# Altium PCB Vehicle_Interface_Tester.PcbDoc (part 1 of 2)
Units mm, origin at the board's own origin, x right, y up, seen from the top; angles counter-clockwise.
Board outline 170 x 109 mm, 8 copper layers (Top Layer, InnerLayer 1 (GND), InnerLayer 2 (Signal), InnerLayer 3 (GND), InnerLayer 4 (Power), InnerLayer 5 (GND), InnerLayer 6 (Signal), Bottom Layer), stack 1.445 mm thick; 100 components, 59 nets, 436 pads, 116 vias.
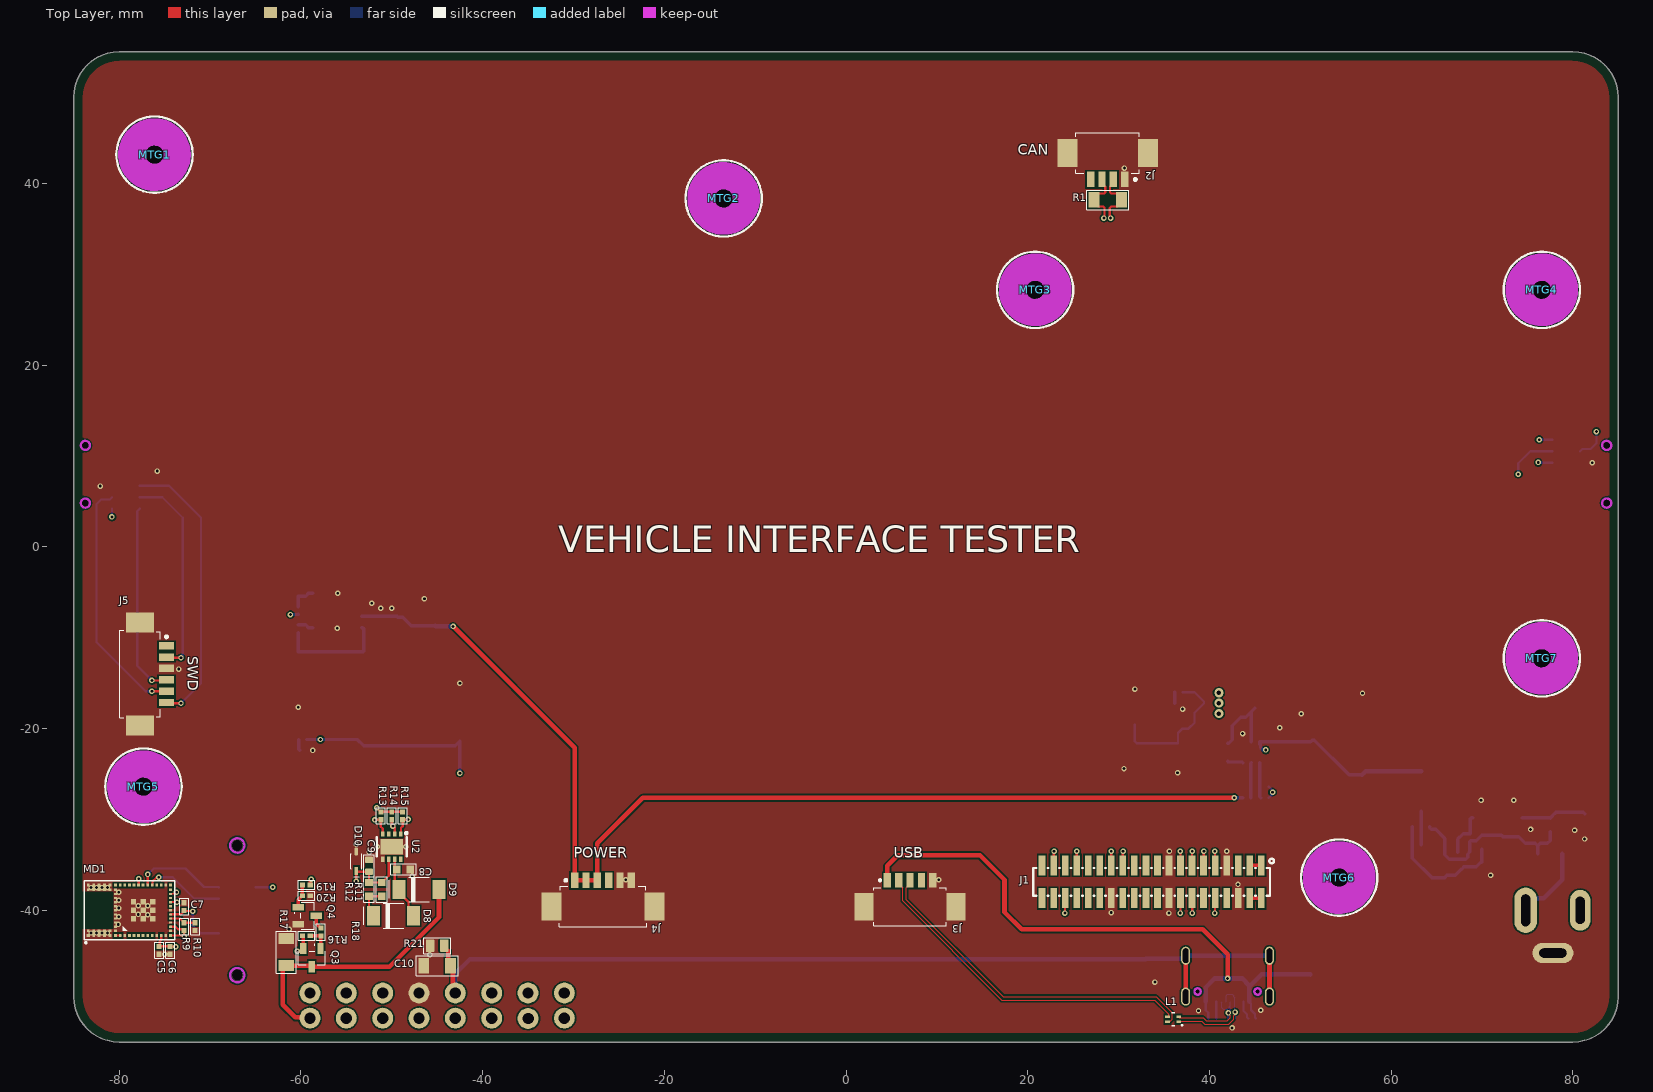
[diagram p0: Top Layer view]
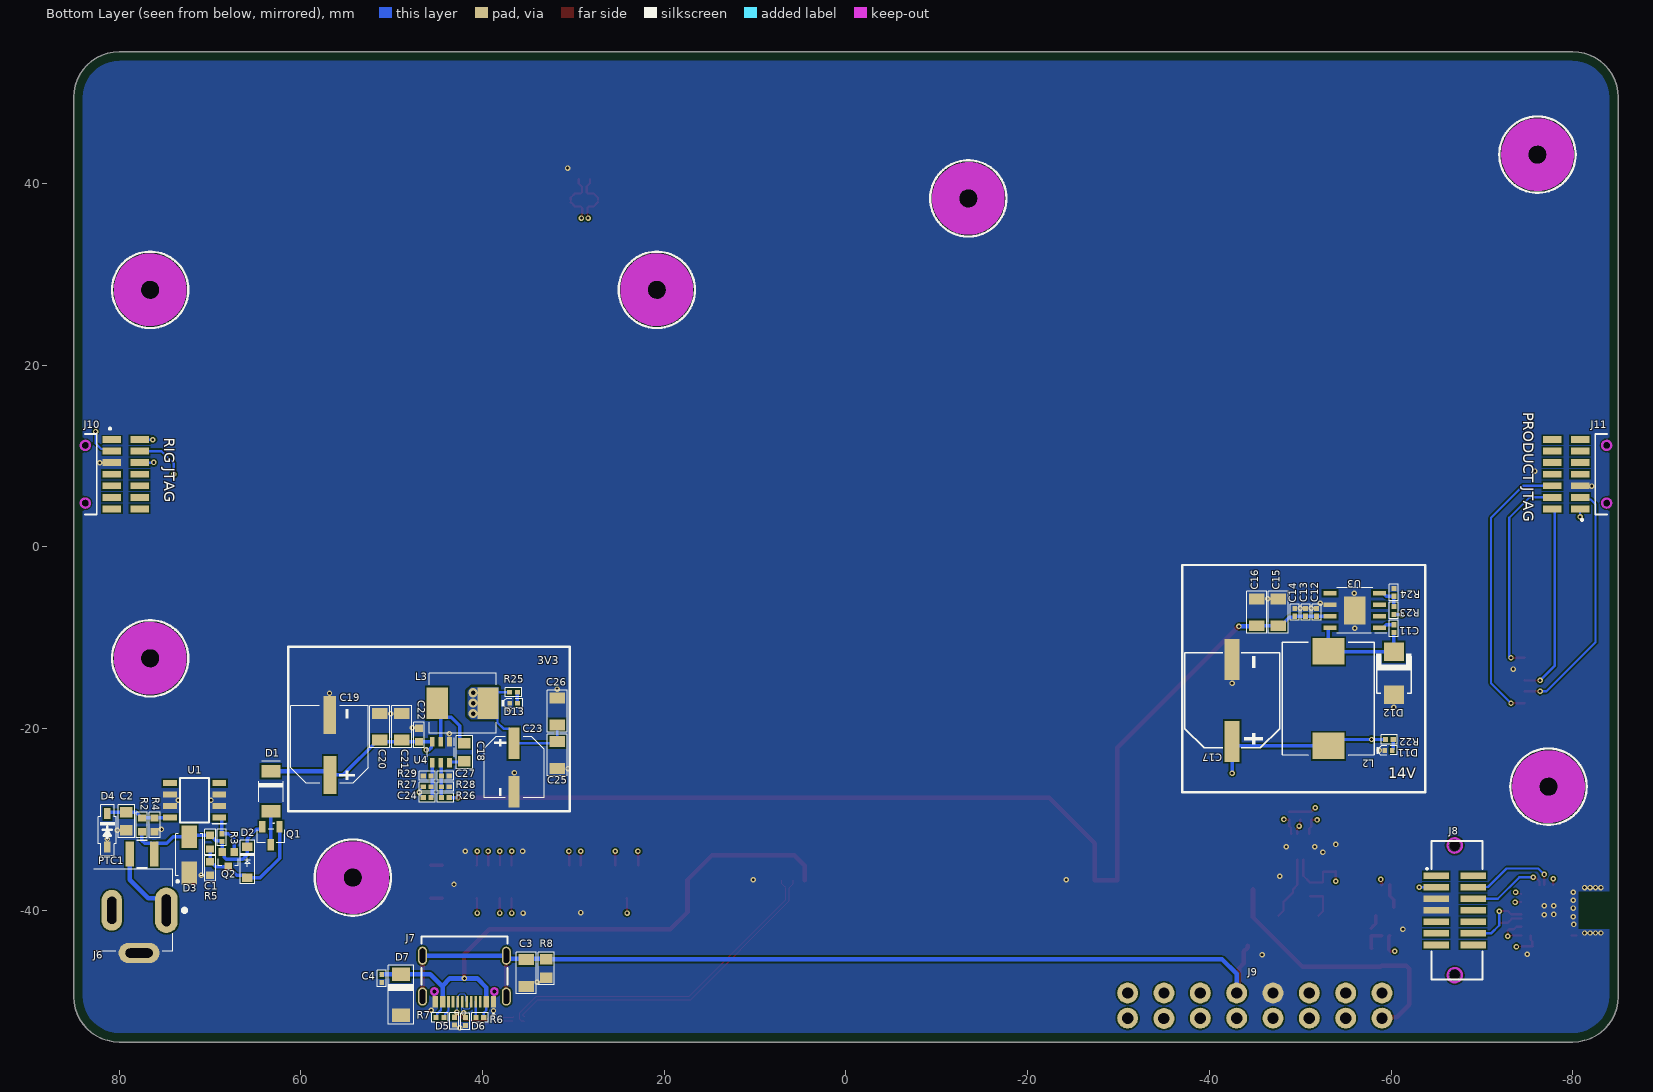
[diagram p1: Bottom Layer view, seen from below]
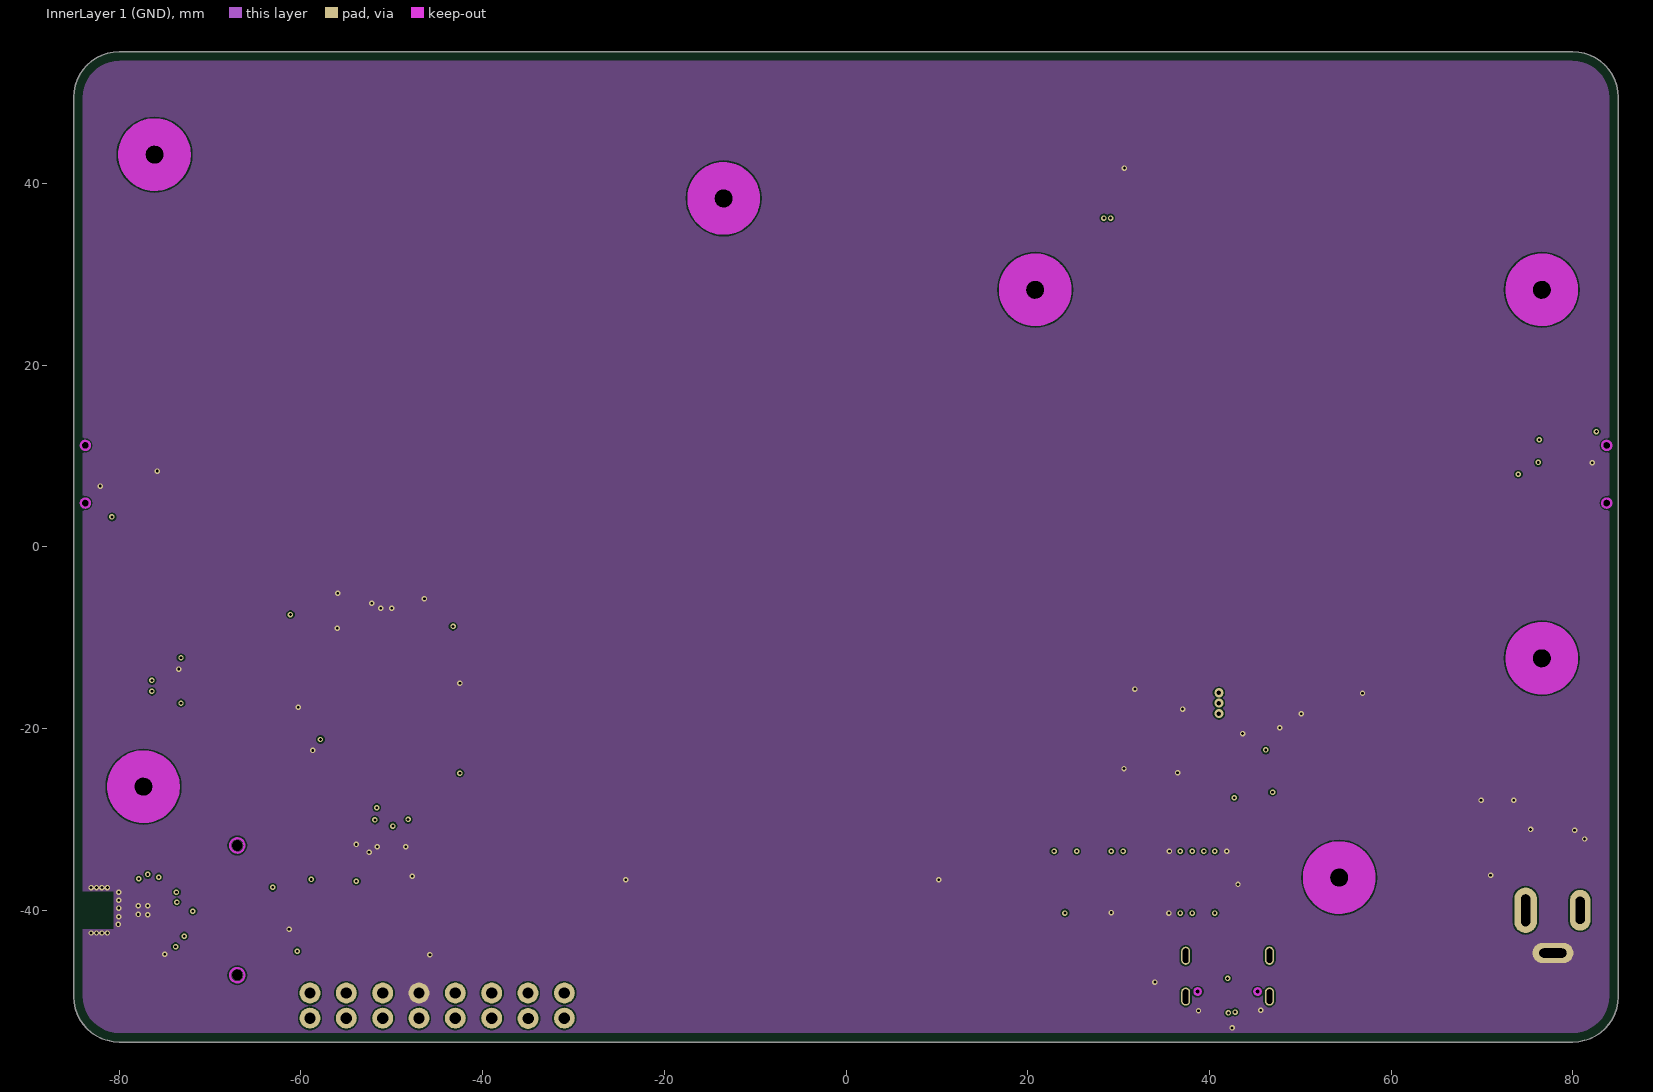
[diagram p2: InnerLayer 1 (GND)]
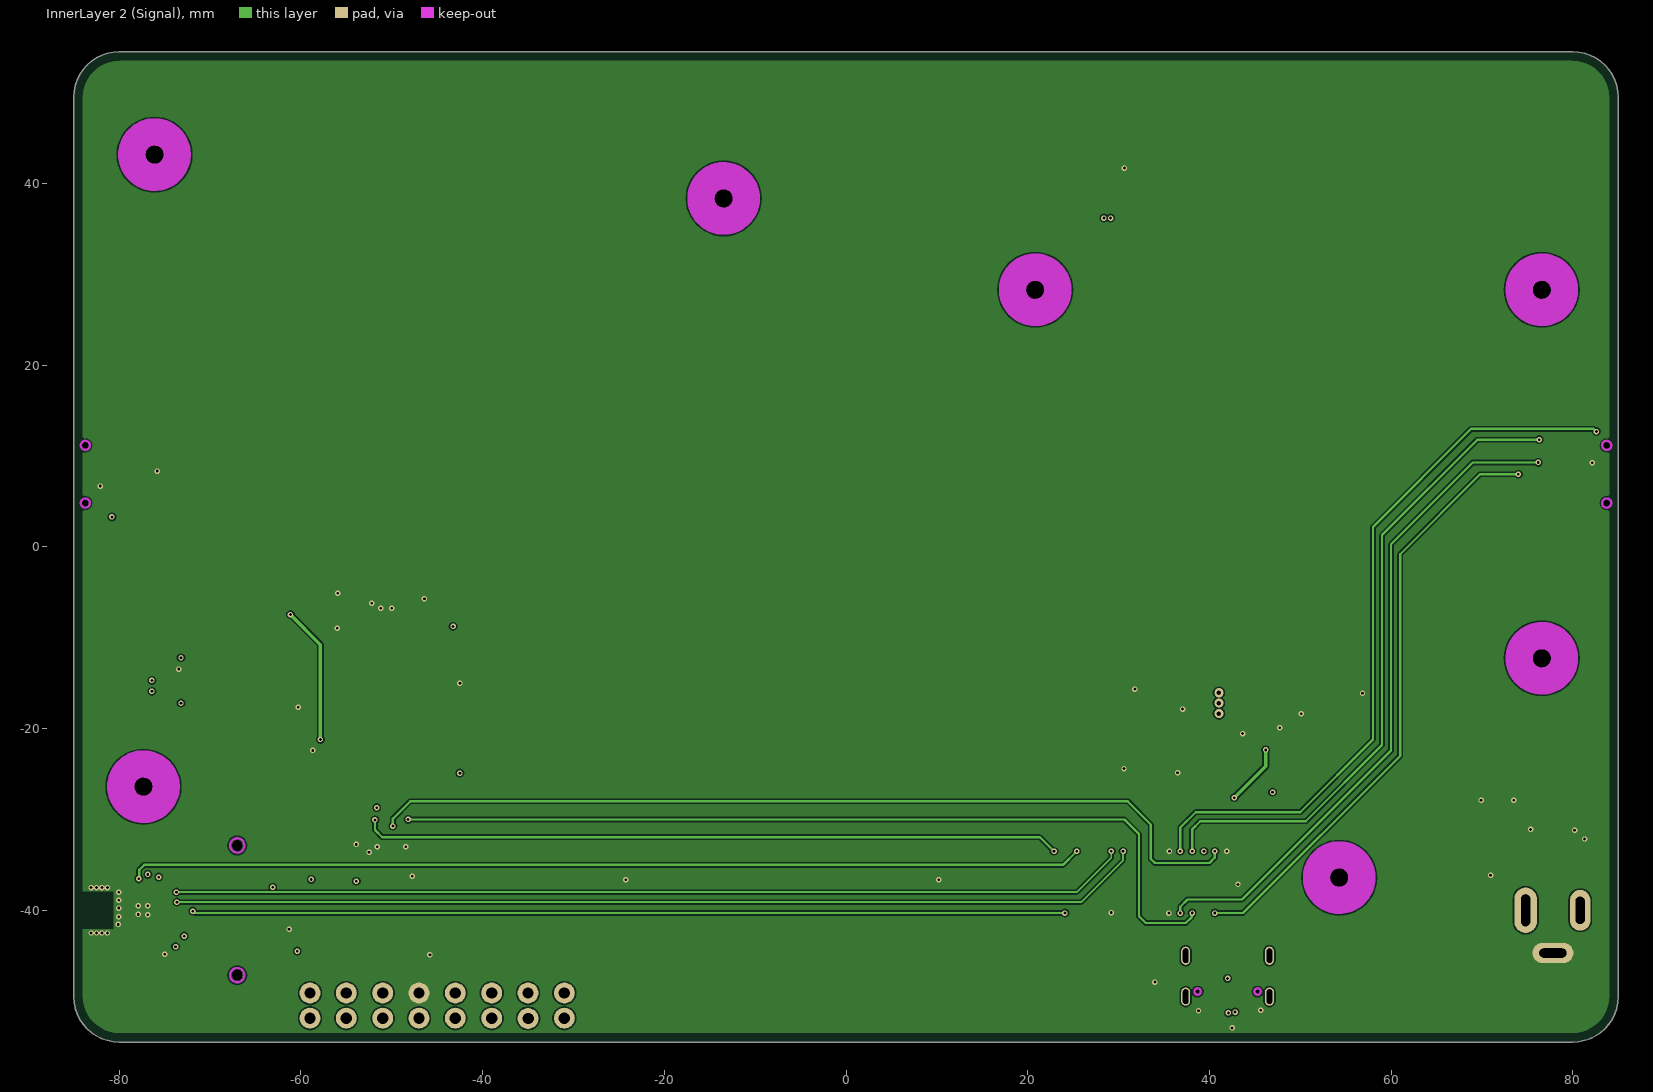
[diagram p3: InnerLayer 2 (Signal)]
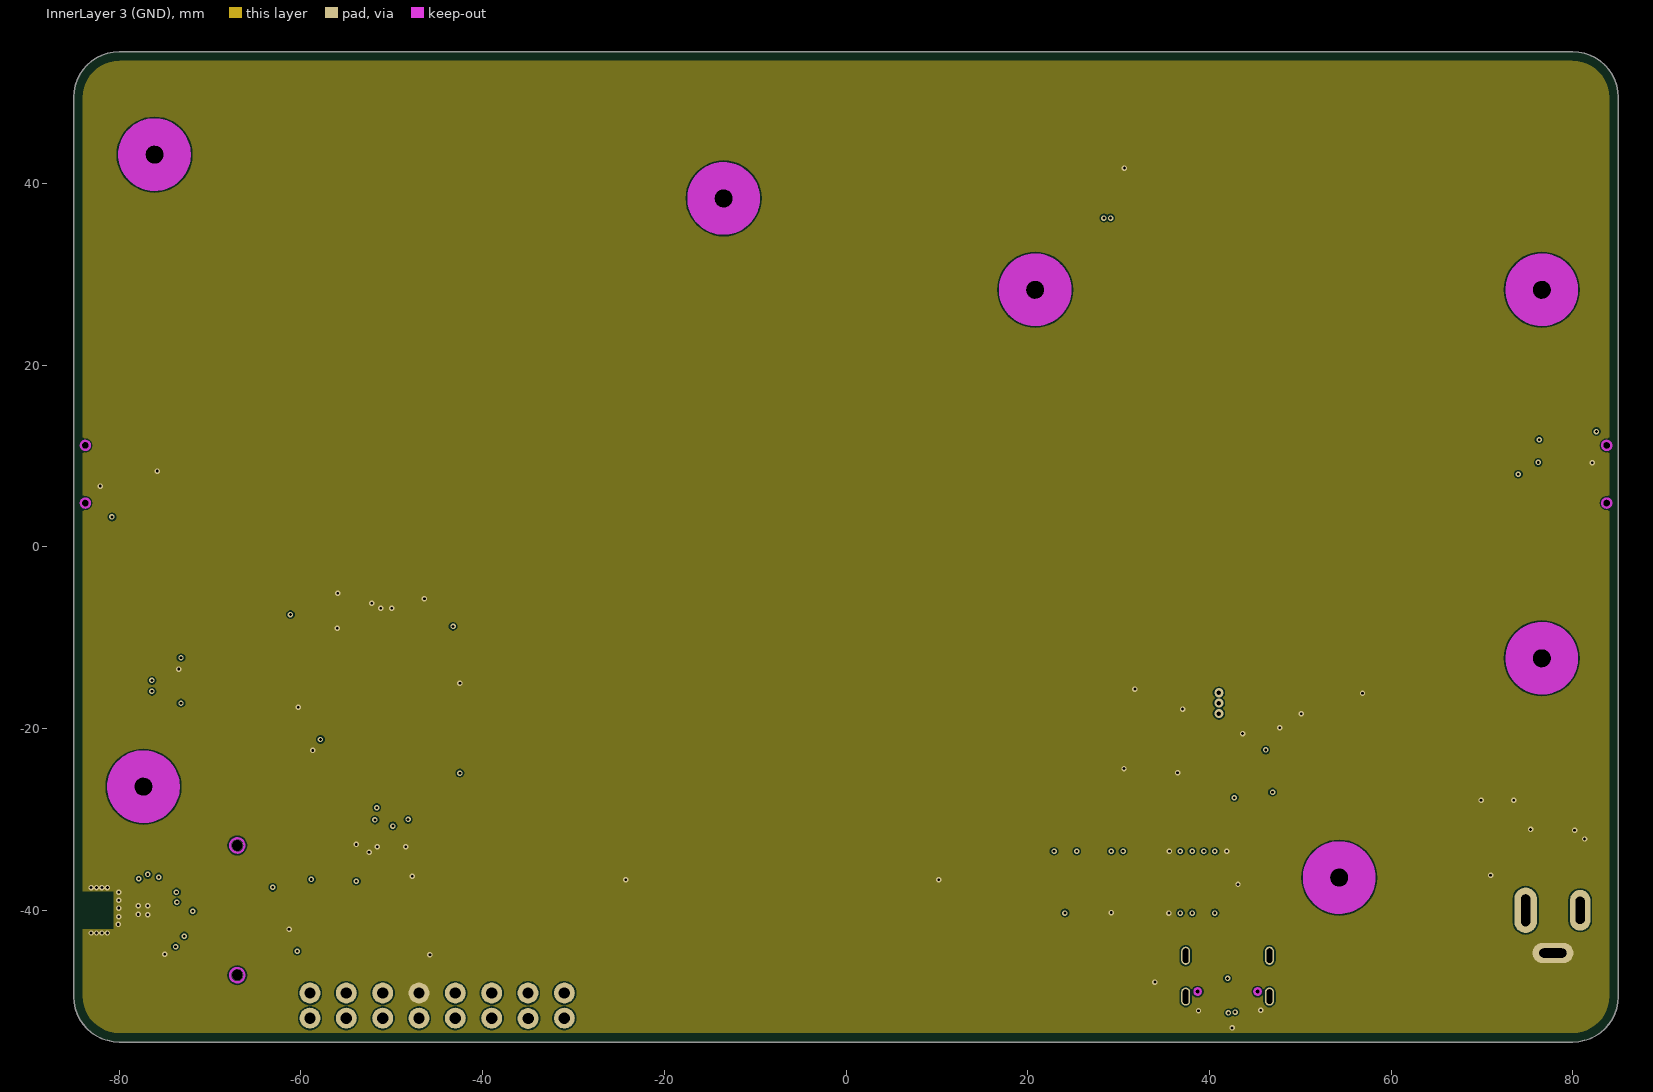
[diagram p4: InnerLayer 3 (GND)]
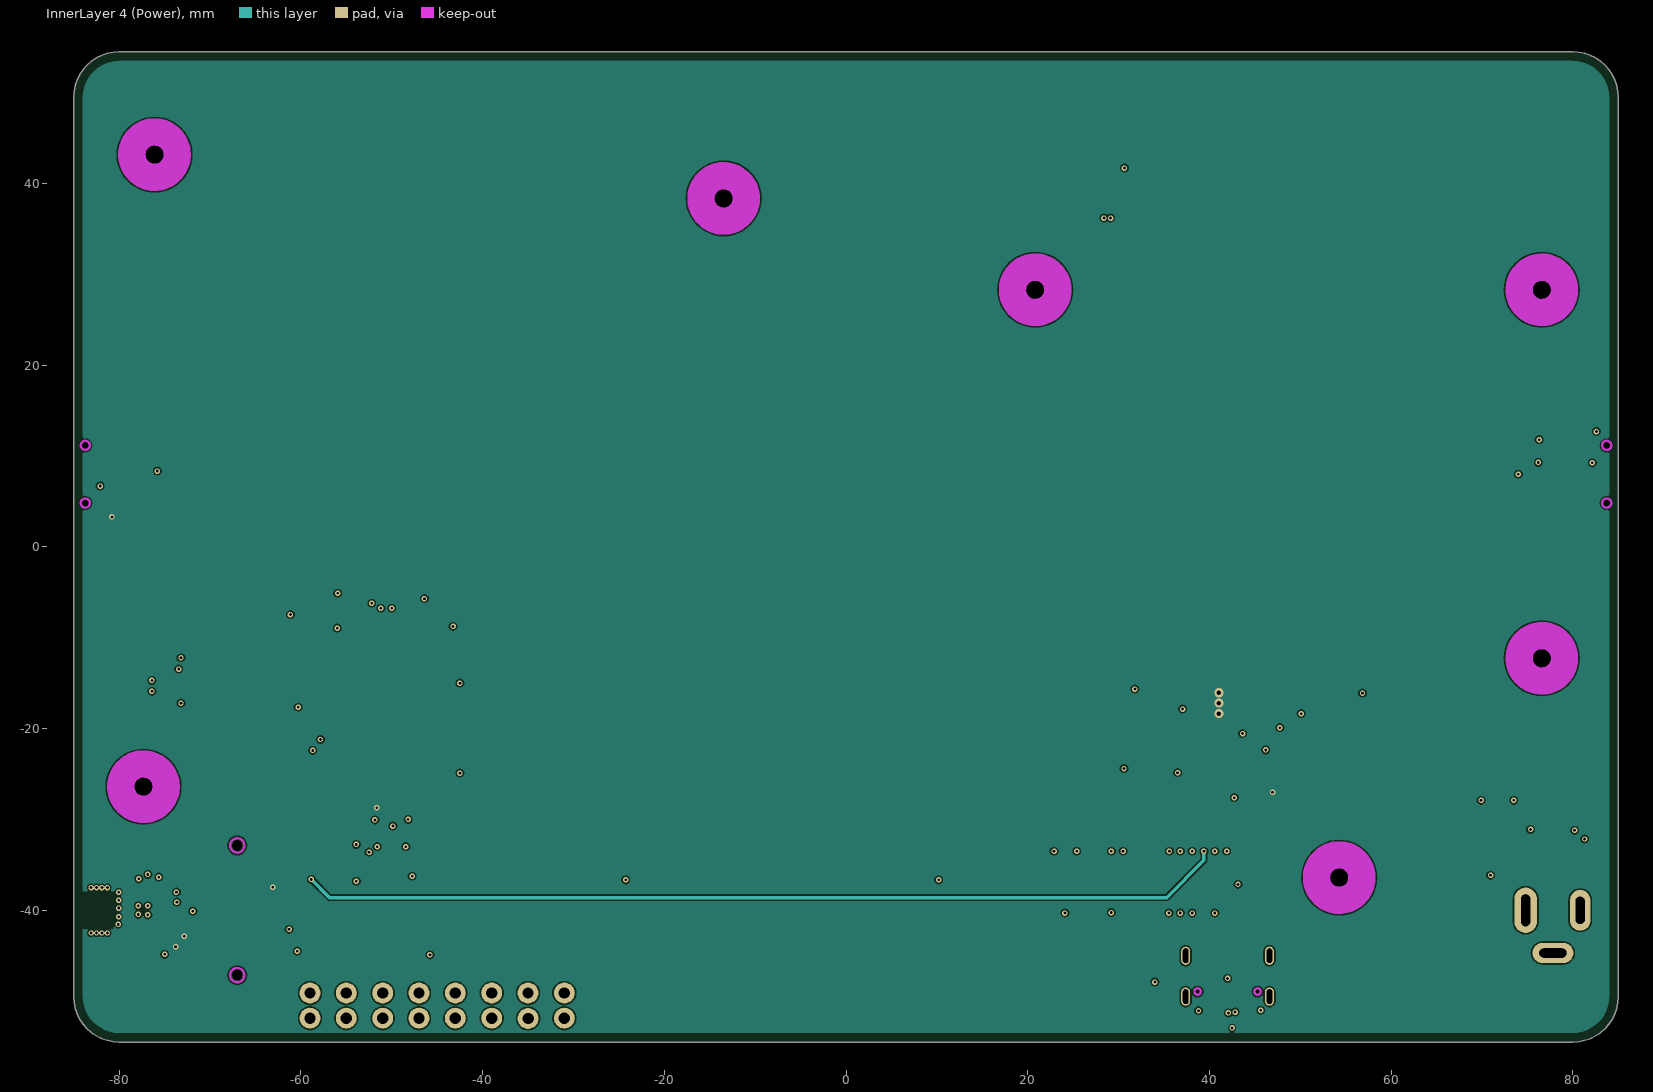
[diagram p5: InnerLayer 4 (Power)]
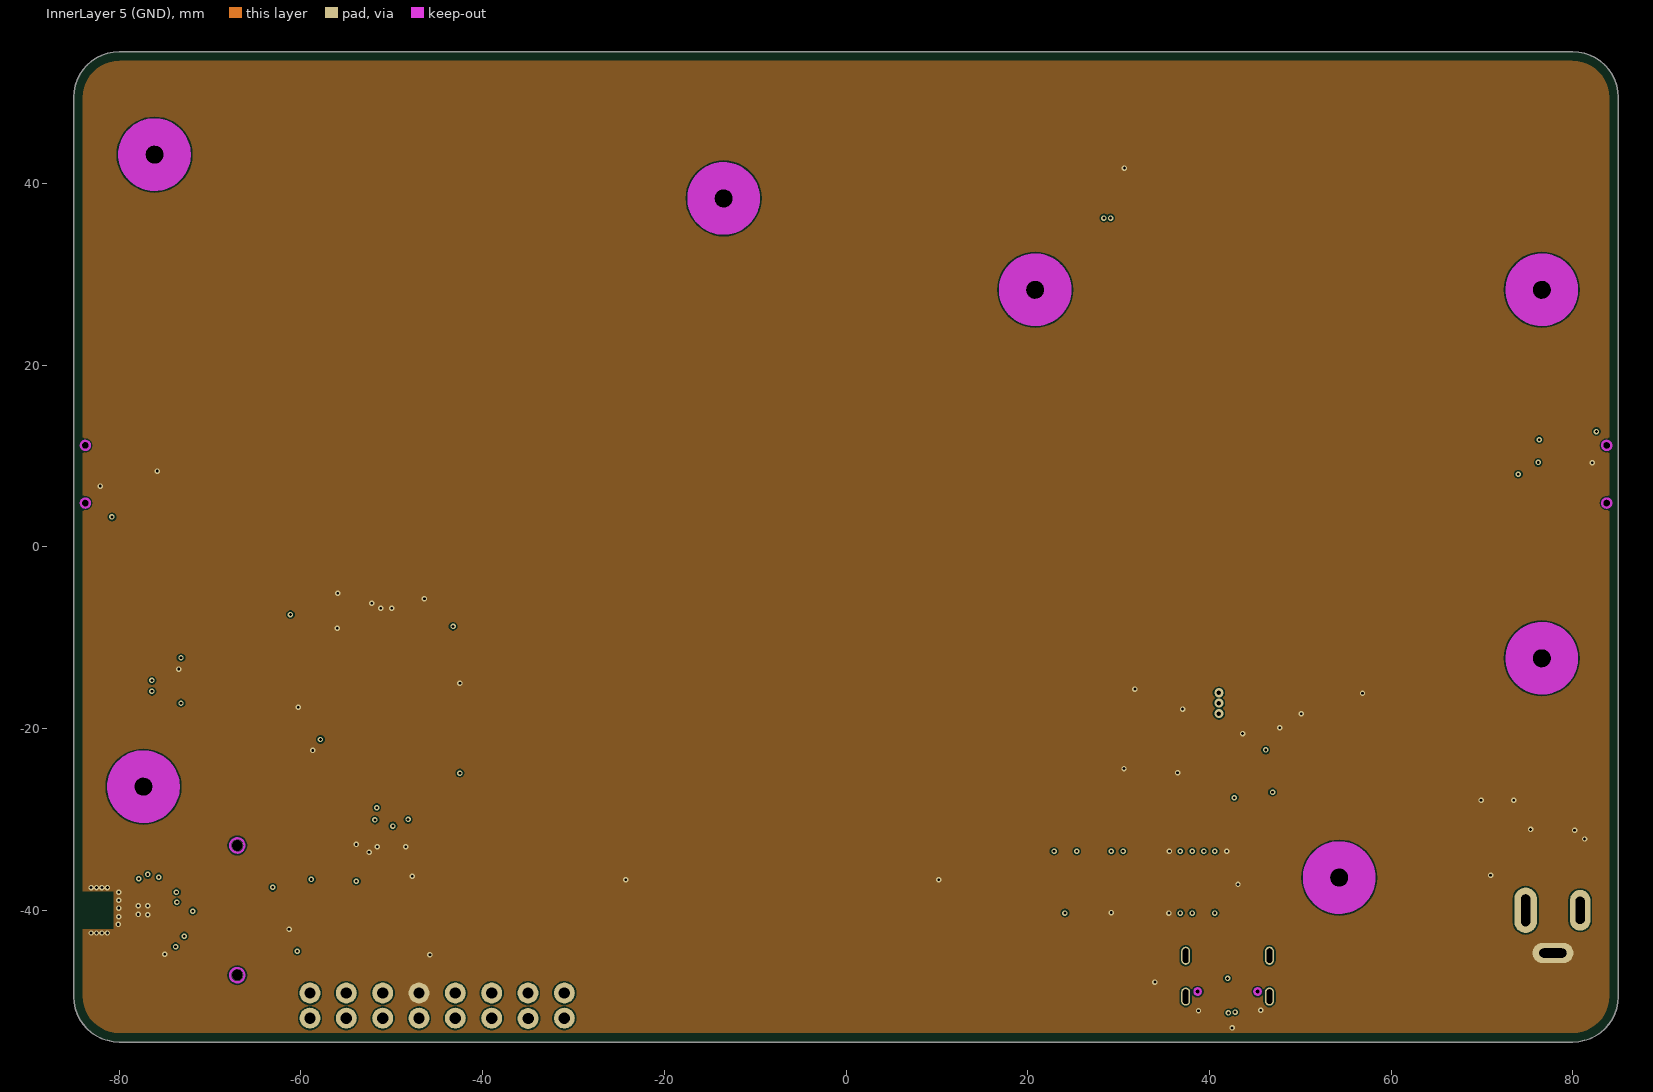
[diagram p6: InnerLayer 5 (GND)]
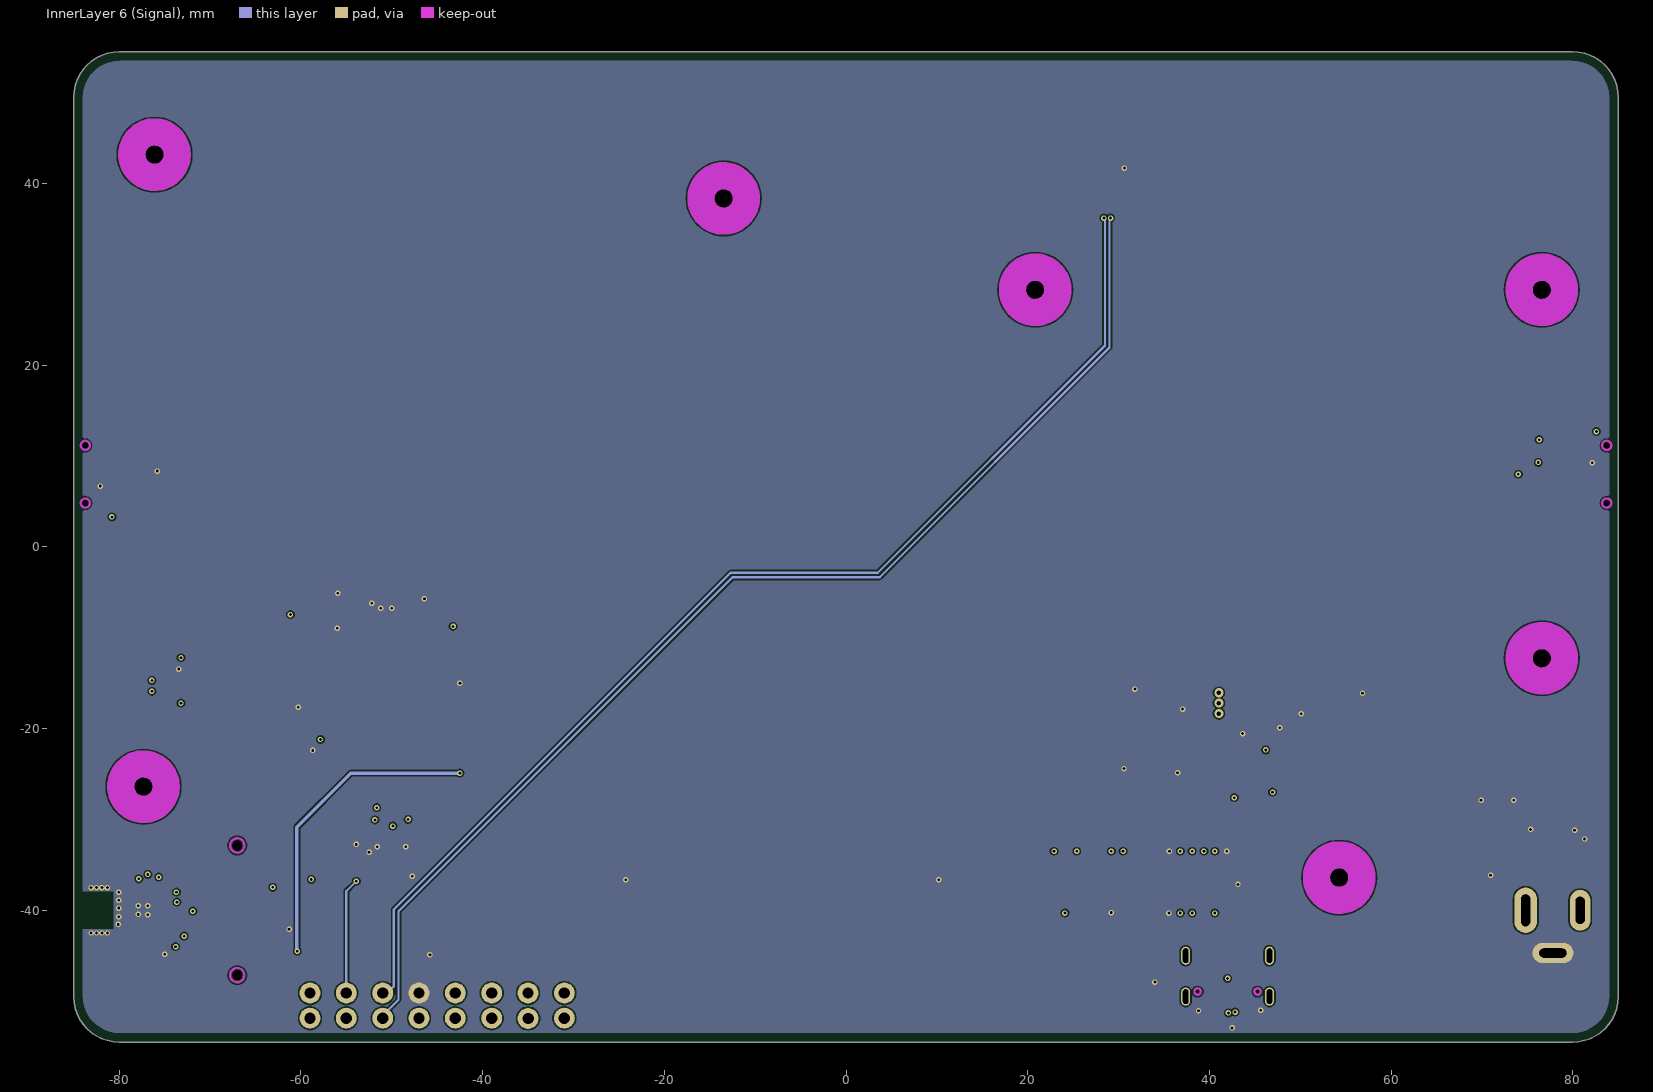
[diagram p7: InnerLayer 6 (Signal)]
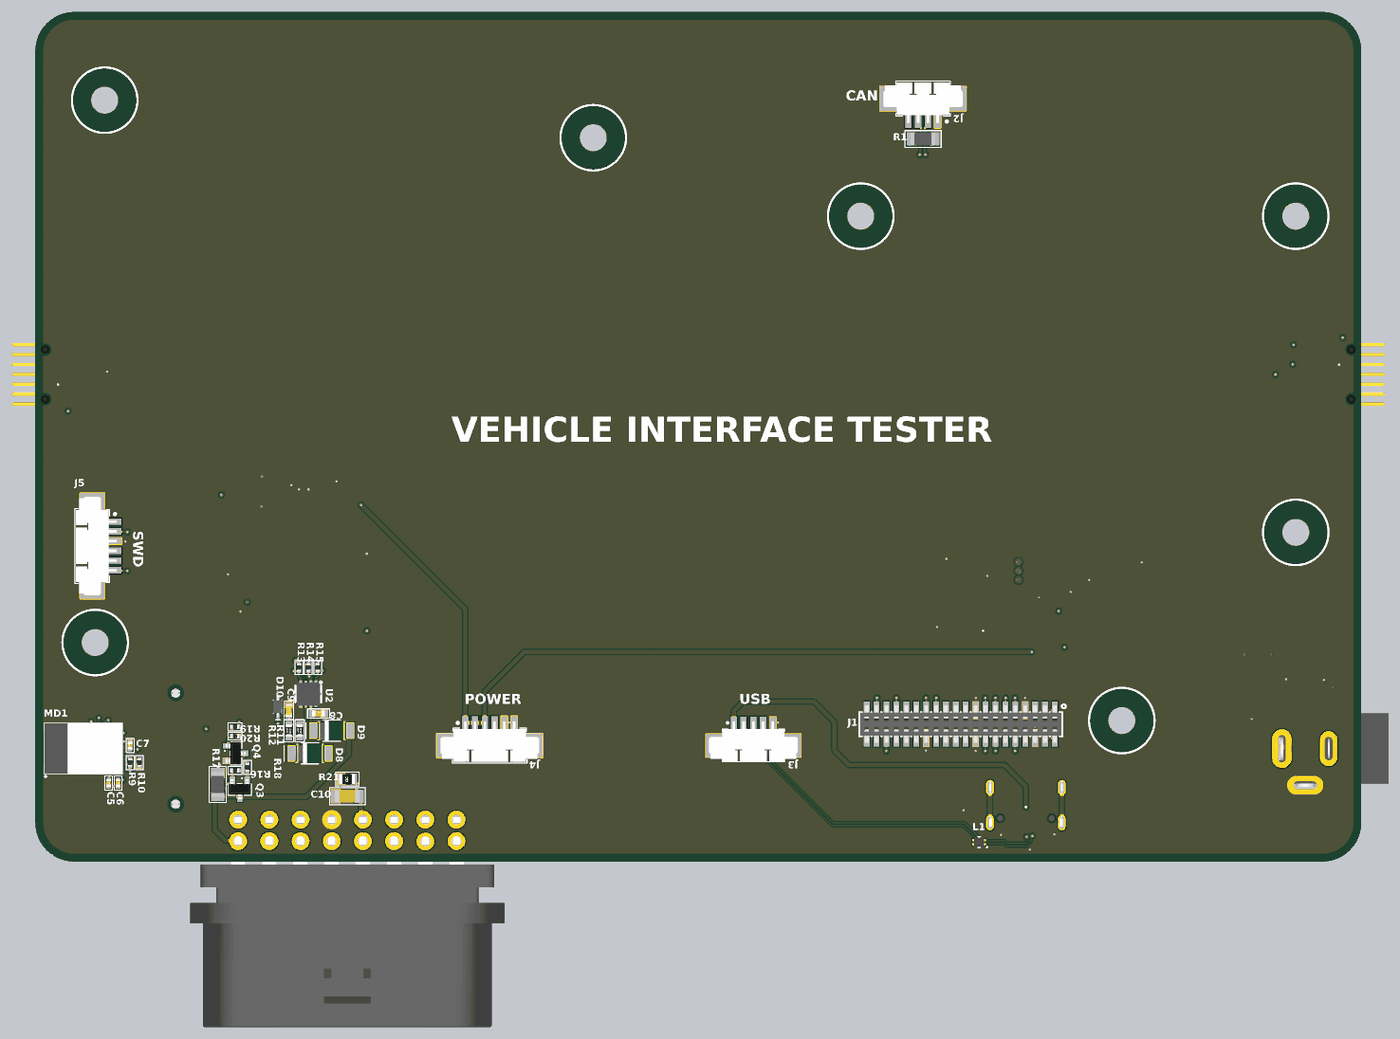
[diagram p9: 3D render of the assembled board from above, using the file's embedded part models]
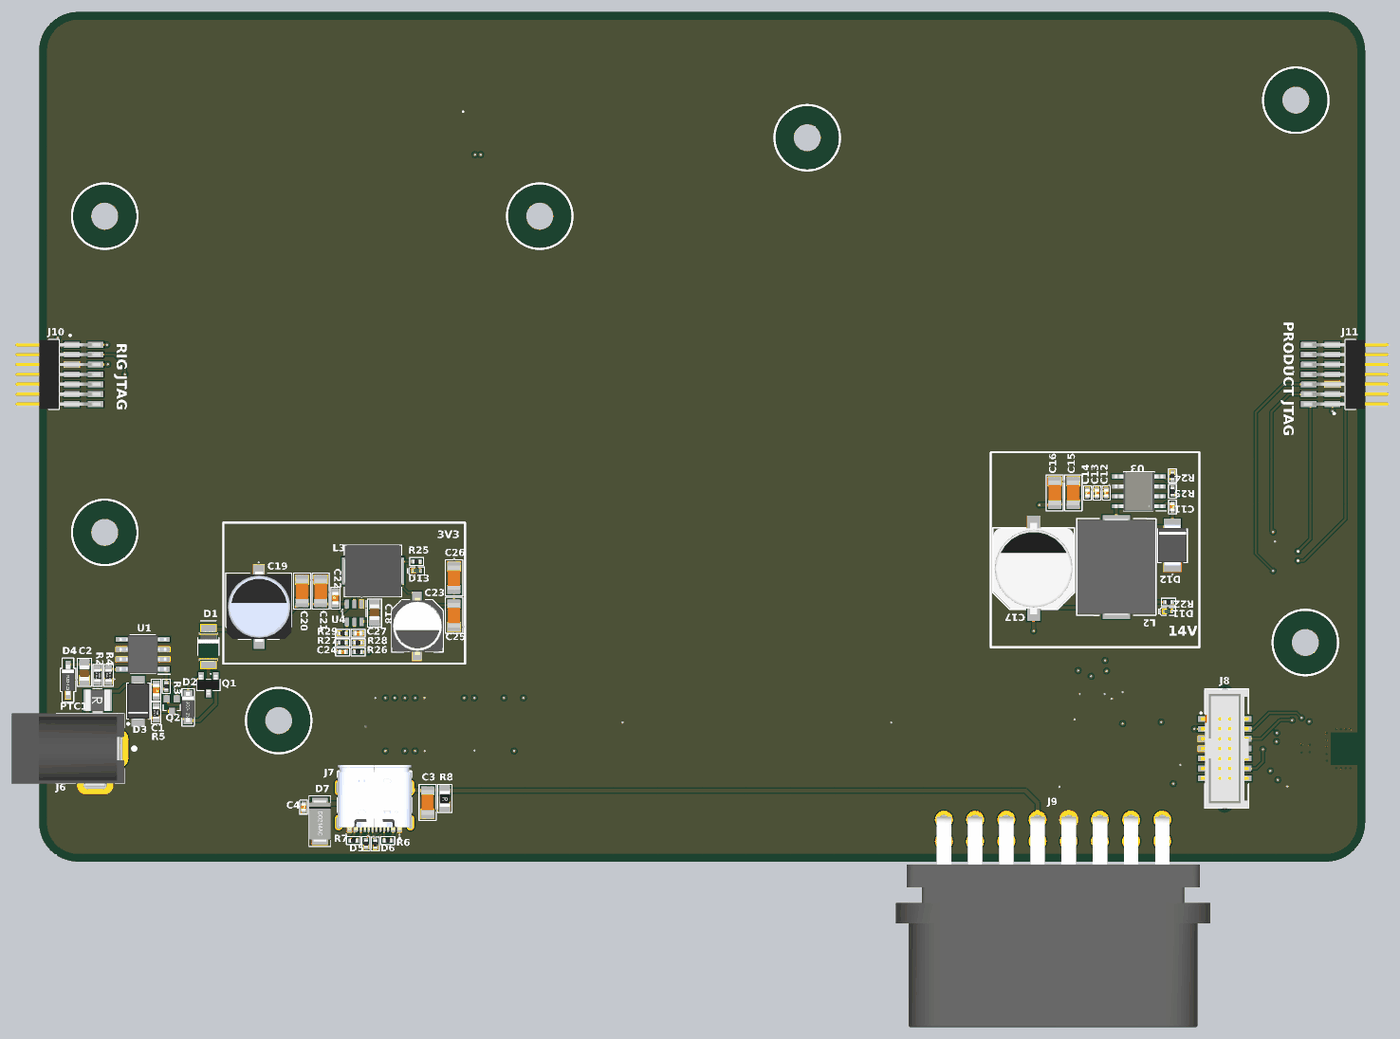
[diagram p10: 3D render of the assembled board from below, using the file's embedded part models]

## Layer stack, top to bottom
Top Solder: solder mask 0.0102, Solder Resist, Dk 3.5
Top Layer: signal copper 0.035
Dielectric 1: prepreg 0.092, PP-013, Dk 4.3
InnerLayer 1 (GND): signal copper 0.0152
Dielectric 2: core 0.25, Core-028, Dk 4.3
InnerLayer 2 (Signal): signal copper 0.0152
Dielectric 3: prepreg 0.1, PP-013, Dk 4.3
InnerLayer 3 (GND): signal copper 0.0152
Dielectric 4: core 0.4, Core-034, Dk 4.6
InnerLayer 4 (Power): signal copper 0.0152
Dielectric 5: prepreg 0.1, PP-013, Dk 4.3
InnerLayer 5 (GND): signal copper 0.0152
Dielectric 6: core 0.25, Core-028, Dk 4.3
InnerLayer 6 (Signal): signal copper 0.0152
Dielectric 7: prepreg 0.092, PP-013, Dk 4.3
Bottom Layer: signal copper 0.035
Bottom Solder: solder mask 0.0102, Solder Resist, Dk 3.5

## Board outline
85,49.5 84.957,50.153 84.83,50.794 84.619,51.413 84.33,52 83.967,52.544 83.536,53.036 83.044,53.467 82.5,53.83 81.913,54.119 81.294,54.33 80.653,54.457 80,54.5 -80,54.5 -80.653,54.457 -81.294,54.33 -81.913,54.119 -82.5,53.83 -83.044,53.467 -83.536,53.036 -83.967,52.544 -84.33,52 -84.619,51.413 -84.83,50.794 -84.957,50.153 -85,49.5 -85,-49.5 -84.957,-50.153 -84.83,-50.794 -84.619,-51.413 -84.33,-52 -83.967,-52.544 -83.536,-53.036 -83.044,-53.467 -82.5,-53.83 -81.913,-54.119 -81.294,-54.33 -80.653,-54.457 -80,-54.5 80,-54.5 80.653,-54.457 81.294,-54.33 81.913,-54.119 82.5,-53.83 83.044,-53.467 83.536,-53.036 83.967,-52.544 84.33,-52 84.619,-51.413 84.83,-50.794 84.957,-50.153 85,-49.5

## Design rules (kind name [scope] priority, off if disabled: settings)
BoardOutlineClearance [All] p1: gap=1 ignorepadtopadclearanceinfootprint=FALSE except(0.5: SMDPad-OutlineEdge SMDPad-CavityEdge SMDPad-CutoutEdge SMDPad-SplitBarrior SMDPad-SplitContinuation)
Clearance Clearance_Chassis [InNet('CHASSIS')] p1: gap=1.5 ignorepadtopadclearanceinfootprint=TRUE except(1: Arc-SMDPad Track-SMDPad SMDPad-SMDPad)
Clearance "Fuse to Holder" [(HasFootprint('Single Pin Receptacle')) vs (HasFootprint('Fuse NO BOM'))] p2: gap=0.127 ignorepadtopadclearanceinfootprint=FALSE except(0: Arc-Hole Track-Hole SMDPad-Hole THPad-Hole Via-Hole Fill-Hole Poly-Hole Region-Hole Text-Hole)
Clearance "Clearance_Poly to Hole_1" [Hole vs InPolygon] p3 off: gap=0.2 ignorepadtopadclearanceinfootprint=FALSE
Clearance Clearance_RS232_PadHole [Hole vs (HasFootprint('9POS D-Sub male Hearting 09551296822741'))] p4 off: gap=0 ignorepadtopadclearanceinfootprint=FALSE
Clearance "Clearance_Poly to Poly" [InPolygon vs InPolygon] p5: gap=0.254 ignorepadtopadclearanceinfootprint=FALSE
Clearance "Clearance_Poly to BGA" [InPolygon vs (InComponent('U1') OR InComponent('U3'))] p6 off: gap=0.178 ignorepadtopadclearanceinfootprint=FALSE except(0: Arc-Hole Track-Hole SMDPad-Hole THPad-Hole Via-Hole Fill-Hole Poly-Hole Region-Hole Text-Hole)
Clearance "Clearance_Poly to All" [InPolygon] p7: gap=0.165 ignorepadtopadclearanceinfootprint=FALSE except(0: Arc-Hole Track-Hole SMDPad-Hole THPad-Hole Via-Hole Fill-Hole Poly-Hole Region-Hole Text-Hole)
Clearance [All] p8: gap=0.127 ignorepadtopadclearanceinfootprint=FALSE except(0: Arc-Hole Track-Hole SMDPad-Hole THPad-Hole Via-Hole Fill-Hole Poly-Hole Region-Hole Text-Hole)
ComponentClearance ComponentClearance_LDC_3D [HasFootprint('Newhaven 7 inch 800x480')] p1: gap=0 collisioncheckmode=3 verticalgap=0 showdistances=FALSE
ComponentClearance ComponentClearance_PCIe [HasFootprint('164 POS PCIe Connector (for NXP Tower Elevator)')] p2: gap=0.254 collisioncheckmode=3 verticalgap=0 showdistances=FALSE
ComponentClearance [All] p3: gap=0.254 collisioncheckmode=3 verticalgap=0.254 showdistances=FALSE
DiffPairsRouting [All] p1: maxlimit=0.254 minlimit=0.254 mostfreqgap=0.254 toplayer_minwidth=0.125 toplayer_maxwidth=0.381 toplayer_prefwidth=0.125 midlayer1_minwidth=0.125 midlayer1_maxwidth=0.381 midlayer1_prefwidth=0.125 midlayer2_minwidth=0.125 midlayer2_maxwidth=0.381 midlayer2_prefwidth=0.125 midlayer3_minwidth=0.125 midlayer3_maxwidth=0.381 midlayer3_prefwidth=0.125 midlayer4_minwidth=0.125 midlayer4_maxwidth=0.381 midlayer4_prefwidth=0.125 midlayer5_minwidth=0.125 midlayer5_maxwidth=0.381 midlayer5_prefwidth=0.125 midlayer6_minwidth=0.125 midlayer6_maxwidth=0.381 midlayer6_prefwidth=0.125 bottomlayer_minwidth=0.125 bottomlayer_maxwidth=0.381 bottomlayer_prefwidth=0.125 maxuncoupledlength=12.7
FanoutControl Fanout_BGA [IsBGA] p1: bgadir=Out bgaviamode=Centered fanoutstyle=BGA fanoutdirection=Alternating viagrid=0.025 // Fanout_BGA (Default Rule)
Height [All] p1 off: minheight=0 maxheight=25.4 prefheight=12.7
HoleSize HoleSize_DIN_Mount [HasFootprint('IG-010 Mount')] p1: absolutevalues=TRUE maxlimit=25.4 minlimit=0.127 maxpercent=80.000 minpercent=20.000
HoleSize HoleSize_Mounting_Holes [HasFootprint('8-32 with washer with contact Mounting Hole')] p2: absolutevalues=TRUE maxlimit=25.4 minlimit=0.127 maxpercent=80.000 minpercent=20.000
HoleSize [All] p3: absolutevalues=TRUE maxlimit=4 minlimit=0.127 maxpercent=80.000 minpercent=20.000
HoleToHoleClearance [All] p1: gap=0.2 allowstackedmicrovias=TRUE
MatchedLengths SRAM_ALL [(InNetClass('SDRAM_Address') OR InNetClass('SDRAM_Control') OR InNetClass('SDRAM_Data'))] p1: tolerance=0.381 checknetsindiffpair=FALSE checkdiffpairvsdiffpair=TRUE checkxsignals=TRUE checkothers=TRUE
MatchedLengths LCD_All [InNetClass('LCD_Control')] p2: tolerance=0.381 checknetsindiffpair=FALSE checkdiffpairvsdiffpair=TRUE checkxsignals=TRUE checkothers=TRUE
MatchedLengths SRAM_DATA [InNetClass('SDRAM_Data')] p3 off: tolerance=0.381 checknetsindiffpair=FALSE checkdiffpairvsdiffpair=TRUE checkxsignals=TRUE checkothers=TRUE
MatchedLengths SRAM_Address [InNetClass('SDRAM_Address')] p4 off: tolerance=0.381 checknetsindiffpair=FALSE checkdiffpairvsdiffpair=TRUE checkxsignals=TRUE checkothers=TRUE
MinimumAnnularRing [All] p1: minimumring=0.102
MinimumSolderMaskSliver [All] p1 off: minsoldermaskwidth=0.102
PlaneClearance [All] p1 off: clearance=0.254
PlaneConnect [All] p1 off: planeconnectstyle=Relief reliefexpansion=0 reliefentries=4 reliefconductorwidth=0.254 reliefairgap=0.127
PolygonConnect "Chassis Plane Connect" [All] p1: connectstyle=Direct reliefconductorwidth=0.254 reliefentries=4 polygonreliefangle="90 Angle" airgapwidth=0.254
PolygonConnect "Soft start connect plane" [HasFootprint('TMLF-4, No Silk')] p2 off: connectstyle=Direct reliefconductorwidth=0.254 reliefentries=4 polygonreliefangle="90 Angle" airgapwidth=0.254
PolygonConnect MOSFET_GND [HasFootprint('DPAK508P1524X483-3N')] p3 off: connectstyle=Direct reliefconductorwidth=0.254 reliefentries=4 polygonreliefangle="90 Angle" airgapwidth=0.254
PolygonConnect Power_connector_GND [HasFootprint('2pos Power, TE Connectivity')] p4 off: connectstyle=Direct reliefconductorwidth=0.254 reliefentries=4 polygonreliefangle="90 Angle" airgapwidth=0.254
PolygonConnect 5V_reg [HasFootprint('D2PAK-STB35NF10T4')] p5 off: connectstyle=Direct reliefconductorwidth=0.254 reliefentries=4 polygonreliefangle="90 Angle" airgapwidth=0.254
PolygonConnect "3V3 Connect" [InNet('3V3_micro')] p6 off: connectstyle=Direct reliefconductorwidth=0.254 reliefentries=4 polygonreliefangle="90 Angle" airgapwidth=0.254
PolygonConnect PolygonConnect_USB_Power [InNet('NetFB1_1')] p7 off: connectstyle=Direct reliefconductorwidth=0.254 reliefentries=4 polygonreliefangle="90 Angle" airgapwidth=0.254
PolygonConnect PolygonConnect_Buck-SW [InNet('Buck-SW')] p8 off: connectstyle=Direct reliefconductorwidth=0.254 reliefentries=4 polygonreliefangle="90 Angle" airgapwidth=0.254
PolygonConnect PolygonConnect_Buck-In [InNet('Buck-IN')] p9 off: connectstyle=Direct reliefconductorwidth=0.254 reliefentries=4 polygonreliefangle="90 Angle" airgapwidth=0.254
PolygonConnect [All] p10 off: connectstyle=Relief reliefconductorwidth=0.254 reliefentries=4 polygonreliefangle="90 Angle" airgapwidth=0.127
RoutingVias [All] p1: holewidth=0.254 width=0.508 viastyle="Through Hole" minholewidth=0.127 minwidth=0.33 maxholewidth=0.711 maxwidth=1.27
SMDToPlane [All] p1 off: distance=0
ShortCircuit ShortCircuit_disableU5 [InComponent('U5') vs IsVia] p1: allowed=TRUE
ShortCircuit [All] p2: allowed=FALSE
SilkToSilkClearance [All] p1: silktosilkclearance=0.1
SilkToSolderMaskClearance [IsPad] p1: minsilkscreentomaskgap=0.1 clearancetoexposedcopper=TRUE
SolderMaskExpansion SolderMaskExpansion_Via [IsVia] p1: expansion=0 istentingtop=TRUE
SolderMaskExpansion [All] p2: expansion=0.07 istentingtop=FALSE
SupplyNets "Schematic Supply Nets_16" [InNet('24V_SW')] p1: voltage=0.000
SupplyNets "Schematic Supply Nets_15" [InNet('VBUS')] p2: voltage=0.000
SupplyNets "Schematic Supply Nets_14" [InNet('+5V')] p3: voltage=0.000
SupplyNets "Schematic Supply Nets_13" [InNet('14V')] p4: voltage=0.000
SupplyNets "Schematic Supply Nets_12" [InNet('14V_SWITCHED')] p5: voltage=0.000
SupplyNets "Schematic Supply Nets_11" [InNet('VCC')] p6: voltage=0.000
SupplyNets "Schematic Supply Nets_10" [InNet('CHS_GND')] p7: voltage=0.000
SupplyNets "Schematic Supply Nets_8" [InNet('GND')] p8: voltage=0.000
SupplyNets "Schematic Supply Nets_3" [InNet('3V3')] p9: voltage=0.000
Width Width_Power [(InNet('3V3') OR InNet('V-Batt')OR InNet('V-Bus') OR InNet('6V') OR InNet('24V') OR InNet('GND') OR InNet('NetC48_2') OR InNet('NetC43_2') OR InNet('NetFB5_1') OR InNet('Buck-IN') OR InNet('Buck-SW') OR InNet('14V') OR InNet('~14V')OR InNet('24V_In')OR InNet('24V_Fused')OR InNet('30V_Clamped'))] p1: maxlimit=1.016 minlimit=0.127 preferedwidth=0.2
Width Width_Power_Chassis [InNet('CHASSIS')] p2: maxlimit=3.81 minlimit=0.508 preferedwidth=1.27 midlayer1_maxwidth=2.54 midlayer2_maxwidth=2.54 midlayer3_maxwidth=2.54 midlayer4_maxwidth=2.54 midlayer5_maxwidth=2.54 midlayer6_maxwidth=2.54 minimp=50.000000 maximp=50.000000 favimp=50.000000
Width Width_GND [InNet('GND')] p3: maxlimit=0.5 minlimit=0.127 preferedwidth=0.2
Width [All] p4: maxlimit=0.635 minlimit=0.102 preferedwidth=0.254 minimp=50.000000 maximp=50.000000 favimp=50.000000
18 further rules are at their usual default settings.

## Classes and differential pairs
differential pair class CANBUS: CAN
component class "Vehicle Power": Q3 Q4 R16 R17 R18 R19 R20
component class "OBD II": C10 J9 R21
component class K-Line: C8 C9 D8 D9 D10 R11 R12 R13 R14 R15 U2
component class "JTAG Test Rig": J11
component class "JTAG Product": J10
component class "Dev Board": J1 J2 J3 J4 J5 R1
component class Bluetooth: C5 C6 C7 J8 MD1 R9 R10
component class "14V Buck Supply": C11 C12 C13 C14 C15 C16 C17 D11 D12 L2 R22 R23 R24 U3
component class "3V3 Buck Supply": C18 C19 C20 C21 C22 C23 C24 C25 C26 C27 D13 L3 R25 R26 R27 R28 R29 U4
differential pair class ZDIFF90: USB USB_CONN USB_D
net class H753_USB_CN: USB_CONN_N USB_CONN_P
net class H753_USB: USB_D_N USB_D_P
component class "USB Host Connector": C3 C4 D5 D6 D7 J7 L1 R6 R7 R8
component class Top_Level: MTG1 MTG2 MTG3 MTG4 MTG5 MTG6 MTG7
component class "Input Power": C1 C2 D1 D2 D3 D4 J6 PTC1 Q1 Q2 R2 R3 R4 R5 U1
differential pair CAN: +CAN_P -CAN_N
differential pair USB_D: +USB_D_P -USB_D_N
differential pair USB_CONN: +USB_CONN_P -USB_CONN_N

## Components (designator, comment, footprint, x,y, rotation, side; value= is the part's Value field where it differs from the comment)
C1 ".1uF" "C0603 (1608)" 70,-32.5 r270 bottom
C2 "10nF" "C0805 (2012)" 79.2,-30.2 r270 bottom
C3 "1nF 2KV" "C1206 (3216)" 35.2,-46.9 r270 bottom
C4 "100nF" "C0402 (1005)" 51.1,-47.5 r270 bottom
C5 "100nF" "C0402 (1005)" -75.6,-44.4 r270 top
C6 "100nF" "C0402 (1005)" -74.4,-44.4 r270 top
C7 "100nF" "C0402 (1005)" -72.85,-39.6 r90 top
C8 ".1uF" "C0603 (1608)" -48.7,-35.5 r0 top
C9 "220pF" "C0603 (1608), TIGHT" -52.5,-35.1 r90 top
C10 "1nF 2KV" "C1206 (3216)" -45,-46.1 r180 top
C11 "10nF" "C0402 (1005)" -60.3,-9 r270 bottom
C12 "10nF" "C0402 (1005)" -51.8,-7.2 r90 bottom
C13 "10nF" "C0402 (1005)" -50.6,-7.2 r90 bottom
C14 "10nF" "C0402 (1005)" -49.4,-7.2 r90 bottom
C15 "10uF" "C1206 (3216)" -47.6,-7.2 r90 bottom
C16 "10uF" "C1206 (3216)" -45.2,-7.2 r90 bottom
C17 "220uF" "Cap D10xL10.2mm" -42.5,-16.9 r90 bottom
C18 ".1uF" "C0805 (2012)" 42,-22.6 r90 bottom
C19 "100uF" "Cap D8xL10.2mm" 56.8,-21.8 r90 bottom
C20 "10uF" "C1206 (3216)" 51.3,-19.8 r90 bottom
C21 "10uF" "C1206 (3216)" 48.9,-19.8 r90 bottom
C22 "100nF" "C0603 (1608)" 47,-20.7 r90 bottom
C23 "220uF" "Cap D6.3xL7.7mm" 36.5,-24.3 r270 bottom
C24 "47pF" "C0402 (1005)" 46.1,-27.6 r180 bottom
C25 "22uF" "C1206 (3216)" 31.8,-22.9 r270 bottom
C26 "22uF" "C1206 (3216)" 31.8,-18.1 r90 bottom
C27 "10nF" "C0402 (1005)" 44.1,-25.2 r180 bottom
D1 "PMEG3050EP,115" SOD-128 63.3,-26.9 r270 bottom
D2 "BZT52C12-7-F" "SOD-123 Diode" 65.9,-34.7 r270 bottom
D3 "26V TVS" Diodes_SMA_0 72.3,-33.9 r90 bottom
D4 "BAT54W" "Diode SOD-123" 81.3,-31.2 r270 bottom
D5 "TVS/ESD" "R0402 (1005)" 43.1,-52.2 r90 bottom
D6 "TVS/ESD" "R0402 (1005)" 41.9,-52.233 r90 bottom
D7 "6.8V" DO-214AC 49,-49.3 r270 bottom
D8 "PMEG3050EP,115" SOD-128 -49.8,-40.6 r0 top
D9 "PMEG3050EP,115" SOD-128 -47,-37.7 r0 top
D10 "3-PF 24-V 30-KV ESD PROTECTION D" SOD-323_IPC_C -53.9,-34.6 r90 top
D11 "Green" "LED Green 0402 (1005)" -59.7,-22.4 r180 bottom
D12 "SS56B" DO-214AA -60.3,-13.9 r270 bottom
D13 "Green" "LED Green 0402 (1005)" 36.6,-17.2 r180 bottom
J1 "HC-PM127-4.3H-2x20PS" "Connector 40 Pos Header 1.27mm (.5\") HC-PM127-4.3H-2x20PS" 33.648,-36.858 r180 top locked
J2 "532610471" "Connector 4 pos PicoBlade Molex 532610001" 28.8,43.37 r0 top locked
J3 "532610671" "Connector 5 pos PicoBlade Molex 532610571" 7,-39.6 r180 top locked
J4 "532610571" "Connector 6 pos PicoBlade Molex 532610001" -26.75,-39.6 r180 top locked
J5 "532610571" "Connector 6 pos PicoBlade Molex 532610001" -77.7,-14 r90 top locked
J6 "PJ-002A" "Connector PJ-002A" 74.81,-40 r0 bottom locked
J7 "USB4800-03-A" "Connector USB C Raised USB4800-03-A" 42,-45 r0 bottom locked
J8 "JTAG 14 Pos Header 1.27mm Pitch (.5\") (ST Micro)" "Connector 14 Pos Samtec SHF-107-01-L-D-SM" -67,-40 r270 bottom
J9 "16 Pos J1962F Female OBDII Connector" "Connector 16 Pos J1962F Female OBDII Connector" -45,-54.4 r0 bottom locked
J10 "FTSH-107-01-X-DH-A-JTAG" "Connector 14 pos SAMTEC_FTSH-107-01-X-DH-A" 79.275,8 r90 bottom locked
J11 "FTSH-107-01-X-DH-A-JTAG" "Connector 14 pos SAMTEC_FTSH-107-01-X-DH-A" -79.275,8 r270 bottom
L1 "CMC 100MA 2LN 90 OHM SMD" "INDUCTOR MCZ1210AH TDK" 36,-52 r180 top value=90Ohms@100MHz
L2 "15uH" "Inductor 11.5x10mm SMD" -53.1,-16.7 r270 bottom
L3 "10uH" "Inductor 7.2x6.6mm SMD" 42.2,-17.2 r180 bottom
MD1 "STM32WB1MMCH6TR" LGA-77 -78.425,-40 r90 top
MTG1 "Mounting Hole M3" "Mounting Hole M3" -76.11,43.18 r0 top locked
MTG2 "Mounting Hole M3" "Mounting Hole M3" -13.47,38.36 r0 top locked
MTG3 "Mounting Hole M3" "Mounting Hole M3" 20.82,28.3 r0 top locked
MTG4 "Mounting Hole M3" "Mounting Hole M3" 76.59,28.3 r0 top locked
MTG5 "Mounting Hole M3" "Mounting Hole M3" -77.33,-26.39 r0 top locked
MTG6 "Mounting Hole M3" "Mounting Hole M3" 54.29,-36.4 r0 top locked
MTG7 "Mounting Hole M3" "Mounting Hole M3" 76.59,-12.26 r0 top locked
PTC1 "2A" "R1210 (3225)" 77.5,-33.8 r180 bottom
Q1 "SQ2309ES-T1-GE3-VB" SOT-23-3 63.3,-31.8 r90 bottom
Q2 "MMBT3906" "SC70 (SOT-323)" 68,-34.4 r90 bottom
Q3 "SQ2309ES-T1-GE3-VB" SOT-23-3 -58.8,-45.2 r90 top
Q4 "MMBT3904" SOT-23-3 -59.3,-40.6 r180 top
R1 "120R" "R1206 (3216)" 28.8,38.2 r0 top
R2 "24.9K" "R0603 (1608)" 77.5,-30.6 r270 bottom
R3 "10K" "R0402 (1005)" 68.7,-32 r270 bottom
R4 "2.49K" "R0603 (1608)" 76.1,-30.6 r90 bottom
R5 "100K" "R0603 (1608)" 70,-35.4 r270 bottom
R6 "56K" "R0402 (1005)" 40.3,-51.8 r0 bottom
R7 "56K" "R0402 (1005)" 44.7,-51.8 r180 bottom
R8 "10M" "R0805 (2012)" 33,-46.4 r270 bottom
R9 "10K" "R0402 (1005)" -72.85,-41.8 r270 top
R10 "10K" "R0402 (1005)" -71.65,-41.8 r270 top
R11 "2K" "R0603 (1608)" -51.1,-37.7 r90 top
R12 "2K" "R0603 (1608)" -52.5,-37.7 r90 top
R13 "4.7K" "R0402 (1005)" -51.2,-29.6 r90 top
R14 "4.7K" "R0402 (1005)" -50,-29.6 r90 top
R15 "4.7K" "R0402 (1005)" -48.8,-29.6 r90 top
R16 "10K" "R0402 (1005)" -59.4,-42.8 r180 top
R17 "2.2K" "R1206 (3216)" -61.6,-44.6 r270 top
R18 "1K" "R0402 (1005)" -57.8,-42.4 r270 top
R19 "10K" "R0402 (1005)" -59.4,-37.2 r0 top
R20 "100K" "R0402 (1005)" -59.4,-38.4 r180 top
R21 "10M" "R0805 (2012), TIGHT" -45,-43.9 r180 top
R22 "13K" "R0402 (1005)" -59.8,-21.2 r0 bottom
R23 "21K" "R0402 (1005)" -60.3,-7 r270 bottom
R24 "2K" "R0402 (1005)" -60.3,-5 r270 bottom
R25 "680R" "R0402 (1005)" 36.6,-16 r0 bottom
R26 "300K" "R0402 (1005)" 44.1,-27.6 r180 bottom
R27 "68K" "R0402 (1005)" 46.1,-26.4 r0 bottom
R28 "22K" "R0402 (1005)" 44.1,-26.4 r0 bottom
R29 "15K" "R0402 (1005)" 46.1,-25.2 r180 bottom
U1 "TL431AIDR" SOIC-8 71.7,-27.9 r90 bottom
U2 "IC TRANSCEIVER 1/1 8HVSON" HVSON-8 -50,-33 r270 top
U3 "TPS5450DDAR" SOP-8-EP-150mil -56,-7 r0 bottom
U4 "TPS54302DDCR" SOT-23-6 44.6,-22.6 r0 bottom

## Footprints (in the part's own frame and the unit in brackets; to place one, negate y for a bottom-side part, rotate by r counter-clockwise, add the part's x,y. Pads: shape width x height; smd on the part's side, far side on the other; paste and mask are expansions set on the pad)
"C0402 (1005)" [mm] "C0402 (1005)"
  rect 0.566x0.54 smd paste-100 mask+0.051: 1(-0.433,0) 2(0.433,0)
  silkscreen extent -0.9,-0.5 0.9,0.5, body extent -0.5,-0.3 0.5,0.3, height 0.22
"C0603 (1608)" [mm] "Cap 0603 (1608)"
  rect 0.806x0.864 smd paste-100 mask+0.051: 1(-0.75,0) 2(0.75,0)
  silkscreen extent -1.4,-0.6 1.4,0.6, body extent -0.8,-0.4 0.8,0.4, height 0.29
"C0603 (1608), TIGHT" [mil] "Cap 0603 (1608), TIGHT"
  rrect20% 28x33 smd mask+3.15: 1(-25.59,0) 2(25.59,0)
  Top Layer pour cut-out: -11.59,16.5 11.59,16.5 11.59,-16.5 -11.59,-16.5
  silkscreen extent -47,-24 47,24, body extent -31,-16 31,16, height 28
"C0805 (2012)" [mm] "C0805 (2012)"
  rect 1.133x1.377 smd paste-100 mask+0.051: 1(-1,0) 2(1,0)
  silkscreen extent -1.8,-0.9 1.8,0.9, body extent -0.9,-0.6 1.1,0.6, height 1.22
"C1206 (3216)" [mm] "C1206 (3216)"
  rect 1.208x1.701 smd paste-100 mask+0.051: 1(-1.479,0) 2(1.479,0)
  silkscreen extent -2.3,-1.1 2.3,1.1, body extent -1.6,-0.8 1.6,0.8, height 1.15
"Cap D6.3xL7.7mm" [mm] "Cap D6.3xL7.7mm"
  rect 3.5x1.2 smd: 1(-2.695,-0.053) 2(2.645,-0.053)
  silkscreen extent -3.4,-3.3 3.31,3.3, body extent -3.65,-3.3 3.65,3.3, height 7.71
"Cap D8xL10.2mm" [mm] "Cap D8xL10.2mm"
  rect 4.2x1.4 smd: 1(-3.3,0) 2(3.3,0.035)
  silkscreen extent -4.2,-4.2 4.3,4.3, body extent -4.5,-4.15 4.5,4.15, height 10.21
"Cap D10xL10.2mm" [mm] "Cap D10xL10.2mm"
  rect 4.5x1.65 smd paste+0 mask+0.051: 1(-4.5,0) 2(4.5,0)
  silkscreen extent -5.23,-5.23 5.23,5.23, body extent -5.85,-5.15 5.85,5.15, height 10.2
"Connector 4 pos PicoBlade Molex 532610001" [mil] "Connector 4 pos Molex PicoBlade"
  rect 87x122 smd paste+0 mask+4.02: 0(-174.21,-0.18) 0(174.21,-0.18)
  rect 32x67 smd paste+0 mask+4.02: 1(73.82,-114.35) 2(24.61,-114.35) 3(-24.61,-114.35) 4(-73.82,-114.35)
  silkscreen extent -138,-120 138,88, body extent -200,-122 200,83, height 126
"Connector 5 pos PicoBlade Molex 532610571" [mm] "Connector 5 pos MOLEX_532610571"
  rect 2.1x3 smd: 0(-5.102,-0.005) 0(4.998,-0.005)
  rect 0.8x1.6 smd: 1(2.448,-2.905) 2(1.198,-2.905) 3(-0.052,-2.905) 4(-1.302,-2.905) 5(-2.552,-2.905)
  silkscreen extent -4.05,-3 3.95,2.09, body extent -5.75,-3.11 5.65,2.09, height 3.41
"Connector 6 pos PicoBlade Molex 532610001" [mil] "Connector 6 pos PicoBlade Molex 532610001-SD_06_MOL"
  rect 87x122 smd paste+0 mask+4.02: 0(-223.43,-0.18) 0(223.43,-0.18)
  rect 32x67 smd paste+0 mask+4.02: 1(123.03,-114.35) 2(73.82,-114.35) 3(24.61,-114.35) 4(-24.61,-114.35) 5(-73.82,-114.35) 6(-123.03,-114.35)
  silkscreen extent -189,-119 189,88, body extent -249,-122 249,83, height 134
"Connector 14 Pos Samtec SHF-107-01-L-D-SM" [mm] "14 Pos, Header, Shrouded, 1.27mm (.5\") Pitch, Samtec SHF-107-01-L-D-SM"
  rect 0.74x2.795 smd: 1(-3.81,-2.033) 2(-3.81,2.033) 3(-2.54,-2.033) 4(-2.54,2.033) 5(-1.27,-2.033) 6(-1.27,2.033) 7(0,-2.033) 8(0,2.033) 9(1.27,-2.033) 10(1.27,2.033) 11(2.54,-2.033) 12(2.54,2.033) 13(3.81,-2.033) 14(3.81,2.033)
  round 1.19 hole 1.19 unplated: ""(-7.137,0) ""(7.137,0)
  Keep-Out Layer circle w0.254: c-7.137,0 r0.787
  Keep-Out Layer circle w0.254: c7.137,0 r0.787
  silkscreen extent -7.62,-3.15 7.62,3.05, body extent -7.62,-3.05 7.62,3.05, height 5.33
"Connector 14 pos SAMTEC_FTSH-107-01-X-DH-A" [mm] "Connector 14 pos SAMTEC_FTSH-107-01-X-DH-A"
  rect 0.76x2.03 smd: 1(3.81,1.525) 2(3.81,-1.525) 3(2.54,1.525) 4(2.54,-1.525) 5(1.27,1.525) 6(1.27,-1.525) 7(0,1.525) 8(0,-1.525) 9(-1.27,1.525) 10(-1.27,-1.525) 11(-2.54,1.525) 12(-2.54,-1.525) 13(-3.81,1.525) 14(-3.81,-1.525)
  round 1.02 hole 1.02 unplated: ""(-3.175,4.45) ""(3.175,4.45)
  Keep-Out Layer circle w0.254: c3.175,4.45 r0.5
  Keep-Out Layer circle w0.254: c-3.175,4.45 r0.5
  silkscreen extent -4.44,1.65 5.12,4.5, body extent -4.44,-2.14 4.45,8.76, height 3.44
"Connector 16 Pos J1962F Female OBDII Connector" [mm] "Connector 16 Pos J1962F Female OBDII Connector"
  round 2.3 hole 1.25: 1(14,-5.29) 2(10,-5.29) 3(6,-5.29) 4(2,-5.29) 5(-2,-5.29) 6(-6,-5.29) 7(-10,-5.29) 8(-14,-5.29) 9(14,-2.53) 10(10.007,-2.485) 11(6,-2.53) 12(2,-2.53) 13(-2,-2.53) 14(-6,-2.53) 15(-10,-2.53) 16(-14,-2.53)
  body extent -20.14,-5.65 20.14,21.31, height 15.31
"Connector 40 Pos Header 1.27mm (.5\") HC-PM127-4.3H-2x20PS" [mm] "40 Pos, Header, 1.27mm (.5\") Pitch, HC-PM127-4.3H-2x20PS"
  rect 0.74x2.2 smd paste+0 mask+0.051: 1(-12.065,-1.8) 2(-12.065,1.8) 3(-10.795,-1.8) 4(-10.795,1.8) 5(-9.525,-1.8) 6(-9.525,1.8) 7(-8.255,-1.8) 8(-8.255,1.8) 9(-6.985,-1.8) 10(-6.985,1.8) 11(-5.715,-1.8) 12(-5.715,1.8) 13(-4.445,-1.8) 14(-4.445,1.8) 15(-3.175,-1.8) 16(-3.175,1.8) 17(-1.905,-1.8) 18(-1.905,1.8) 19(-0.635,-1.8) 20(-0.635,1.8) 21(0.635,-1.8) 22(0.635,1.8) 23(1.905,-1.8) 24(1.905,1.8) 25(3.175,-1.8) 26(3.175,1.8) 27(4.445,-1.8) 28(4.445,1.8) 29(5.715,-1.8) 30(5.715,1.8)
  rect 0.74x2.2 smd paste+0 mask+0.05: 31(6.985,-1.8) 32(6.985,1.8) 33(8.255,-1.8) 34(8.255,1.8) 35(9.525,-1.8) 36(9.525,1.8) 37(10.795,-1.8) 38(10.795,1.8) 39(12.065,-1.8) 40(12.065,1.8)
  silkscreen extent -13.46,-2.54 13.02,1.55, body extent -12.92,-2.4 12.92,2.4, height 4.6
"Connector PJ-002A" [mm] "Barrel Connector Socket 5.5x2mm"
  oval 2.5x5 hole 1 slot 3.5 at 90 deg: 1(0,0)
  oval 2.25x4.5 hole 1 slot 3 at 90 deg: 2(6,0)
  oval 4.5x2.25 hole 1 slot 3 at 0 deg: 3(3,4.7)
  silkscreen extent -2.2,-4.5 8,4.5, body extent -0.7,-4.5 13.7,4.9, height 11
"Connector USB C Raised USB4800-03-A" [mm] "Connector USB C, Rugged, GCT USB4800-03-A"
  rect 0.6x1.25 smd: A1_B12(-3.2,5.075) A4_B9(-2.4,5.075) B1_A12(3.2,5.075) B4_A9(2.4,5.075)
  rect 0.3x1.25 smd: A5(-1.25,5.075) A6(-0.25,5.075) A7(0.25,5.075) A8(1.25,5.075) B5(1.75,5.075) B6(0.75,5.075) B7(-0.75,5.075) B8(-1.75,5.075)
  oval 1x2 hole 0.6 slot 1.6 at 90 deg: S1(-4.61,0) S2(4.61,0) S3(-4.61,4.5) S4(4.61,4.5)
  round 0.8 hole 0.8 unplated: ""(-3.3,3.94) ""(3.3,3.94)
  Keep-Out Layer circle w0.254: c3.3,3.94 r0.35
  Keep-Out Layer circle w0.254: c-3.3,3.94 r0.35
  silkscreen extent -4.73,-2.1 4.73,6.6, body extent -4.73,-2.9 4.73,5.5, height 5.38
"Diode SOD-123" [mm] "Diode SOD-123"
  rect 1.2x0.7 smd mask+0.051: 1(-1.85,0) 2(1.85,0)
  silkscreen extent -2.82,-1 2.82,1, body extent -1.92,-0.85 1.93,0.85, height 1.42
Diodes_SMA_0 [mm]
  rect 2.5x1.7 smd paste+0 mask+0: 1(-2,0) 2(2,0)
  silkscreen extent -3.05,-1.5 2.3,1.5, body extent -2.41,-1.4 2.41,1.4, height 1.98
DO-214AA [mil] "DO-214AA"
  rect 80.61x86.31 smd: 1(-93,0) 2(93,0)
  silkscreen extent -85,-78 88,78, body extent -105,-71 105,71, height 105
DO-214AC [mm]
  rect 1.5x2 smd mask+0.051: 1(-2.25,0) 2(2.25,0)
  silkscreen extent -3.25,-1.4 3.25,1.4, body extent -2.74,-1.4 2.74,1.4, height 2.3
HVSON-8 [mm]
  rect 0.6x0.4 smd mask+0.051: 1(-1.4,0.975) 2(-1.4,0.325) 3(-1.4,-0.325) 4(-1.4,-0.975) 5(1.4,-0.975) 6(1.4,-0.325) 7(1.4,0.325) 8(1.4,0.975)
  rect 1.7x2.5 smd mask+0.038: 9(0,0)
  silkscreen extent -1.63,-1.65 1.08,1.73, body extent -1.5,-1.49 1.5,1.49, height 1
"Inductor 7.2x6.6mm SMD" [mm] "Inductor 7.2x6.6mm SMD"
  rect 2.35x3.5 smd: 1(-2.8,0) 2(2.8,0)
  silkscreen extent -3.7,-3.3 3.7,3.3, body extent -3.7,-3.3 3.7,3.3, height 2.8
"Inductor 11.5x10mm SMD" [mm] "Inductor 11.5x10mm SMD"
  rect 2.924x3.5 smd: 1(-5.2,0) 2(5.2,0)
  silkscreen extent -6.21,-5.08 6.21,5.07, body extent -6.12,-5 6.12,5, height 4
"INDUCTOR MCZ1210AH TDK" [mil]
  rect 20x12 smd paste-6 mask+0: 1(-24.11,10.83) 2(-24.11,-10.83) 3(24.11,-10.83) 4(24.11,10.83)
  silkscreen extent -42,-28 7,29, body extent -27,-23 27,23, height 24
"LED Green 0402 (1005)" [mm] "LED Green 0402 (1005)"
  rect 0.5x0.54 smd: 1(-0.41,-0.006) 2(0.44,-0.006)
  silkscreen extent -1.27,-0.51 1,0.5, body extent -0.5,-0.25 0.51,0.25, height 0.47
LGA-77 [mm]
  rect 0.35x0.35 smd paste+0 mask+0.051: 1(-2.775,4.988) 18(-2.775,-4.088) 30(2.775,-4.088)
  rect 0.35x0.3 smd paste+0 mask+0.051: 2(-2.775,4.388) 3(-2.775,3.788) 4(-2.775,3.188) 5(-2.775,2.588) 6(-2.775,1.975) 7(-2.775,1.45) 8(-2.775,0.95) 9(-2.775,0.45) 10(-2.775,-0.052) 11(-2.775,-0.553) 12(-2.775,-1.055) 13(-2.775,-1.557) 14(-2.775,-2.058) 15(-2.775,-2.56) 16(-2.775,-3.061) 17(-2.775,-3.563) 31(2.775,-3.563) 32(2.775,-3.061) 33(2.775,-2.56) 34(2.775,-2.058) 35(2.775,-1.556) 36(2.775,-1.055) 37(2.775,-0.553) 38(2.775,-0.052) 39(2.775,0.45) 40(2.775,0.95) 41(2.775,1.45) 42(2.775,1.975) 43(2.775,2.588) 44(2.775,3.188) 45(2.775,3.788) 46(2.775,4.388) 47(2.775,4.988)
  rect 0.25x0.35 smd paste+0 mask+0.051: 19(-2.25,-4.088) 20(-1.8,-4.088) 21(-1.35,-4.088) 22(-0.9,-4.088) 23(-0.45,-4.088) 24(0,-4.088) 25(0.45,-4.088) 26(0.9,-4.088) 27(1.35,-4.088) 28(1.8,-4.088) 29(2.25,-4.088) 53(2.25,1.975) 54(1.8,1.975) 55(1.35,1.975) 56(0.9,1.975) 57(0.45,1.975) 58(0,1.975) 59(-0.45,1.975) 60(-0.9,1.975) 61(-1.35,1.975) 62(-1.8,1.975) 63(-2.25,1.975)
  rect 0.3x0.3 smd paste+0 mask+0.051: 48(2.25,4.988) 49(2.25,4.388) 50(2.25,3.788) 51(2.25,3.188) 52(2.25,2.588) 64(-2.25,2.588) 65(-2.25,3.188) 66(-2.25,3.788) 67(-2.25,4.388) 68(-2.25,4.988)
  rect 0.6x0.6 smd paste+0 mask+0.051: 69(-0.95,0) 70(-0.95,-1.05) 71(-0.95,-2.1) 72(0,-2.1) 73(0,-1.05) 74(0,0) 75(0.95,0) 76(0.95,-1.05) 77(0.95,-2.1)
  silkscreen extent -3.67,-4.55 3.25,5.45, body extent -3.25,-4.55 3.25,5.45, height 1.42
"Mounting Hole M3" [mm] "M3 Mounting Hole"
  round 0 hole 3.45 mask+0: 1(0,0)
  Keep-Out Layer circle w3: c0,0 r2.5
  silkscreen extent -4.2,-4.2 4.2,4.2
"R0402 (1005)" [mm] "R0402 (1005)"
  rect 0.566x0.54 smd paste-100 mask+0.051: 1(-0.433,0) 2(0.433,0)
  silkscreen extent -0.9,-0.5 0.9,0.5, body extent -0.5,-0.25 0.5,0.25, height 0.32
"R0603 (1608)" [mm] "R0603 (1608)"
  rect 0.806x0.864 smd paste-100 mask+0.051: 1(-0.754,0) 2(0.753,0)
  silkscreen extent -1.4,-0.6 1.4,0.6, body extent -0.77,-0.43 0.77,0.43, height 0.44
"R0805 (2012)" [mil] "R0805 (2012)"
  rect 44.59x54.21 smd paste-3937.01 mask+2: 1(-40,0) 2(39.74,0)
  silkscreen extent -71,-35 71,35, body extent -38,-25 41,24, height 20
"R0805 (2012), TIGHT" [mil] "R0805 (2012), TIGHT"
  rrect15% 37x53 smd mask+3.94: 1(-30.71,0.01) 2(30.71,0.01)
  silkscreen extent -59,-35 59,35, body extent -38,-25 41,24, height 20
"R1206 (3216)" [mm] "1206 (3216 Metric)"
  rect 1.208x1.701 smd paste-100 mask+0.051: 1(-1.5,0) 2(1.5,0)
  silkscreen extent -2.3,-1.1 2.33,1.08, body extent -1.6,-0.8 1.6,0.8, height 0.54
"R1210 (3225)" [mil] "R1210 (3225)"
  rect 36x108 smd paste+0 mask+0: 1(-53,0) 2(53,0)
  silkscreen extent -23,-59 23,59, body extent -63,-54 63,54, height 26
"SC70 (SOT-323)" [mm] "SC70 (SOT-323)"
  rect 0.9x0.8 smd: 1(0.8,-0.65) 2(0.8,0.65) 3(-0.8,0)
  silkscreen extent -0.7,-1.1 0.05,1.1, body extent -1.15,-1.05 1.15,1.05, height 1
"SOD-123 Diode" [mm] "SOD-123 Diode"
  rect 0.95x1.15 smd: 1(-1.7,0) 2(1.7,0)
  silkscreen extent -2.4,-0.8 2.4,0.8, body extent -1.98,-0.86 1.87,0.84, height 1.42
SOD-128 [mm]
  rect 1.4x2.1 smd paste-1000 mask+0: 1(-2.2,0) 2(2.2,0)
  silkscreen extent -3.3,-1.35 1.12,1.35, body extent -2.35,-1.25 2.35,1.25, height 1.1
SOD-323_IPC_C [mm]
  rect 0.91x0.392 smd paste+0 mask+0: 1(-1.076,0)
  rrect100% 0.91x0.392 smd paste+0 mask+0: 2(1.076,0)
  silkscreen extent -1.7,-0.6 0.85,0.6, body extent -1.32,-0.65 1.33,0.65, height 1
SOIC-8 [mm] "SOIC-8"
  rect 0.65x1.525 smd: 1(-1.905,-2.712) 2(-0.635,-2.712) 3(0.635,-2.712) 4(1.905,-2.712) 5(1.905,2.712) 6(0.635,2.712) 7(-0.635,2.712) 8(-1.905,2.712)
  silkscreen extent -2.58,-3.47 2.45,1.6, body extent -2.45,-3 2.45,3, height 1.75
SOP-8-EP-150mil [mm] "SOP-8-EP-150mil"
  rect 1.455x0.533 smd paste+0 mask+0: 1(-2.721,1.905) 2(-2.721,0.635) 3(-2.721,-0.635) 4(-2.721,-1.905) 5(2.721,-1.905) 6(2.721,-0.635) 7(2.721,0.635) 8(2.721,1.905)
  rect 2.4x3.1 smd paste-1.537 mask+0: EP(0,0)
  silkscreen extent -3.5,-2.5 2,2.5, body extent -3.1,-2.49 3.1,2.49, height 1.68
SOT-23-3 [mm] "SOT-23-3 SMD"
  rect 1.25x0.7 smd: 1(1,-0.95) 2(1,0.95) 3(-1,0)
  silkscreen extent -0.78,-1.5 1.45,1.5, body extent -1.27,-1.46 1.27,1.46, height 0.97
SOT-23-6 [mm] "SOT-23-6"
  rect 0.532x1.072 smd: 1(-0.95,-1.15) 1(-0.95,-1.15) 2(0,-1.15) 2(0,-1.15) 3(0.95,-1.15) 3(0.95,-1.15) 4(0.95,1.15) 4(0.95,1.15) 5(0,1.15) 5(0,1.15) 6(-0.95,1.15) 6(-0.95,1.15)
  silkscreen extent -1.5,-1.6 1.5,0.5, body extent -1.4,-1.21 1.4,1.22, height 1.09

## Part data
C1 C8: library part "100nF Ceramic, 25V, 0603 (1608)", "100nF Ceramic Capacitor, 25V, X7R, ±10%, 0603 (1608)", LCSC Part Number=C1590, Manufacturer="Samsung Electro-Mechanics", Manufacturer Part Number=CL10B104KA8NNNC, Package="0603 (1608 metric)"
C2: library part "10nF Ceramic, 50V, 0805 (2012)", "10nF Ceramic Capacitor, 50V, ±10%, 0805 (2012)", LCSC Part Number=C1710, Manufacturer="Samsung Electro-Mechanics", Manufacturer Part Number=CL21B103KBANNNC, Package="0805 (2012 metric)"
C3 C10: library part "1nF Ceramic, 2KV, X7R, 1206 (3216)", "1nF Ceramic Capacitor, 2KV, X7R, ±10%, 1206 (3216)", LCSC Part Number=C23631, Manufacturer=YAGEO, Manufacturer Part Number=CC1206KKX7RDBB102, Package="1206 (3216 metric)"
C4 C5 C6 C7: library part "100nF Ceramic, 16V, 0402 (1005)", "100nF Ceramic Capacitor, 16V, X7R, ±10%, 0402 (1005)", LCSC Part Number=C1525, Manufacturer="Samsung Electro-Mechanics", Manufacturer Part Number=CL05B104KO5NNNC, Package="0402 (1005 metric)"
C9: library part "220pF Ceramic, 100V, 0603 (1608)", "220pF Ceramic, 100V, ±10%, X7R, 0603 (1608)", LCSC Part Number=C16194548, Manufacturer="Samsung Electro-Mechanics", Manufacturer Part Number=CL10B221KC85PNC, Package="0603 (1608 metric)"
C11 C12 C13 C14 C27: library part "10nF Ceramic, 50V, 0402 (1005)", "10nF Ceramic Capacitor, 50V, ±10%, 0402 (1005)", LCSC Part Number=C15195, Manufacturer="Samsung Electro-Mechanics", Manufacturer Part Number=CL05B103KB5NNNC, Package="0402 (1005 metric)"
C15 C16 C20 C21: library part "10uF Ceramic, 50V, 1206 (3216)", "10uF Ceramic Capacitor, 50V, ±10%, 1206 (3216)", LCSC Part Number=C13585, Manufacturer="Samsung Electro-Mechanics", Manufacturer Part Number=CL31A106KBHNNNE, Package="1206 (3216 metric)"
C17: library part "220uF Aluminum Electrolytic, 50V, D10x10.2mm", "220uF Aluminum Electrolytic Capacitor, 50V, ±20%, D10x10.2mm", LCSC Part Number=C970698, Manufacturer=DMBJ, Manufacturer Part Number="RVT1H221M1010 220UF 50V", Package=SMD,D6.3xL7.7mm
C18: library part "100nF Ceramic, 50V, 0805 (2012)", "100nF Ceramic Capacitor, 50V, X7R, ±10%, 0805 (2012)", LCSC Part Number=C1711, Manufacturer="Samsung Electro-Mechanics", Manufacturer Part Number=CL21B104KBCNNNC, Package="0805 (2012 metric)"
C19: library part "100uF Aluminum Electrolytic, 50V, D8xL10.2mm", "100uF Aluminum Electrolytic Capacitor, 50V, ±20%, D8xL10.2mm", LCSC Part Number=C72480, Manufacturer=ROQANG, Manufacturer Part Number=RVT1H101M0810, Package=SMD,D8xL10.2mm
C22: library part "100nF Ceramic, 50V, 0603 (1608)", "100nF Ceramic Capacitor, 50V, X7R, ±10%, 0603 (1608)", LCSC Part Number=C14663, Manufacturer=YAGEO, Manufacturer Part Number=CC0603KRX7R9BB104, Package="0603 (1608 metric)"
C23: library part "220uF Aluminum Electrolytic, 25V, D6.3xL7.7mm_1", "220uF Aluminum Electrolytic Capacitor, 25V, ±20%, D6.3xL7.7mm", LCSC Part Number=C2918361, Manufacturer=ROQANG, Manufacturer Part Number=RVT1E221M0607, Package=SMD,D6.3xL7.7mm
C24: library part "47pF Ceramic, 10V, 0402 (1005)", "47pF Ceramic Capacitor, 50Vm C0G, ±5%, 0402 (1005)", LCSC Part Number=C466230, Manufacturer=CCTC, Manufacturer Part Number=TCC0402C0G470J500AT, Package="0402 (1005 metric)"
C25 C26: library part "22uF Ceramic, 25V, 1206 (3216)", "22uF Ceramic Capacitor, 25V, ±10%, 1206 (3216)", LCSC Part Number=C12891, Manufacturer="Samsung Electro-Mechanics", Manufacturer Part Number=CL31A226KAHNNNE, Package="1206 (3216 metric)"
D1 D8 D9: "Schottky Diode, 5A, 30V, SOD-128", LCSC Part Number=C50603, Manufacturer=Nexperia, Package=SOD-128, Manufacturer Part Number=PMEG3050EP,115
D2: "Zener Diode, 12V, 500mW, Surface Mount SOD-123", LCSC Part Number=C124196, Manufacturer="Diodes Incorporated", Package=SOD-123, Zener Voltage=12V, Manufacturer Part Number=BZT52C12-7-F
D3: library part SMAJ26CA-13-F, "26V TVS Diode 9.5A Bidirectional Surface Mount DO-214AC", LCSC Part Number=C134976, Manufacturer="Diodes Incorporated", Package=SMA, Manufacturer Part Number=SMAJ26CA-13-F
D4: "Schottky Diode, 600mA, 30V, SOD-123", LCSC Part Number=C699107, Manufacturer="Yangzhou Yangjie Elec Tech", Package=SOD-123, Manufacturer Part Number=BAT54W